# Altium PCB STAND_SSD_2246(CPU).PcbDoc (part 5 of 7)
Units mm, origin at the board's own origin, x right, y up, seen from the top; angles counter-clockwise.
Board outline 70 x 170 mm, 8 copper layers (L1:Top, L2:GND, L3:Sig, L4:VCC, L5:Sig, L6:Sig, L7:GND, L8:Bot), stack 1.112 mm thick; 174 components, 271 nets, 1671 pads, 771 vias.
Unrouted connection lines stored in the file: 138.
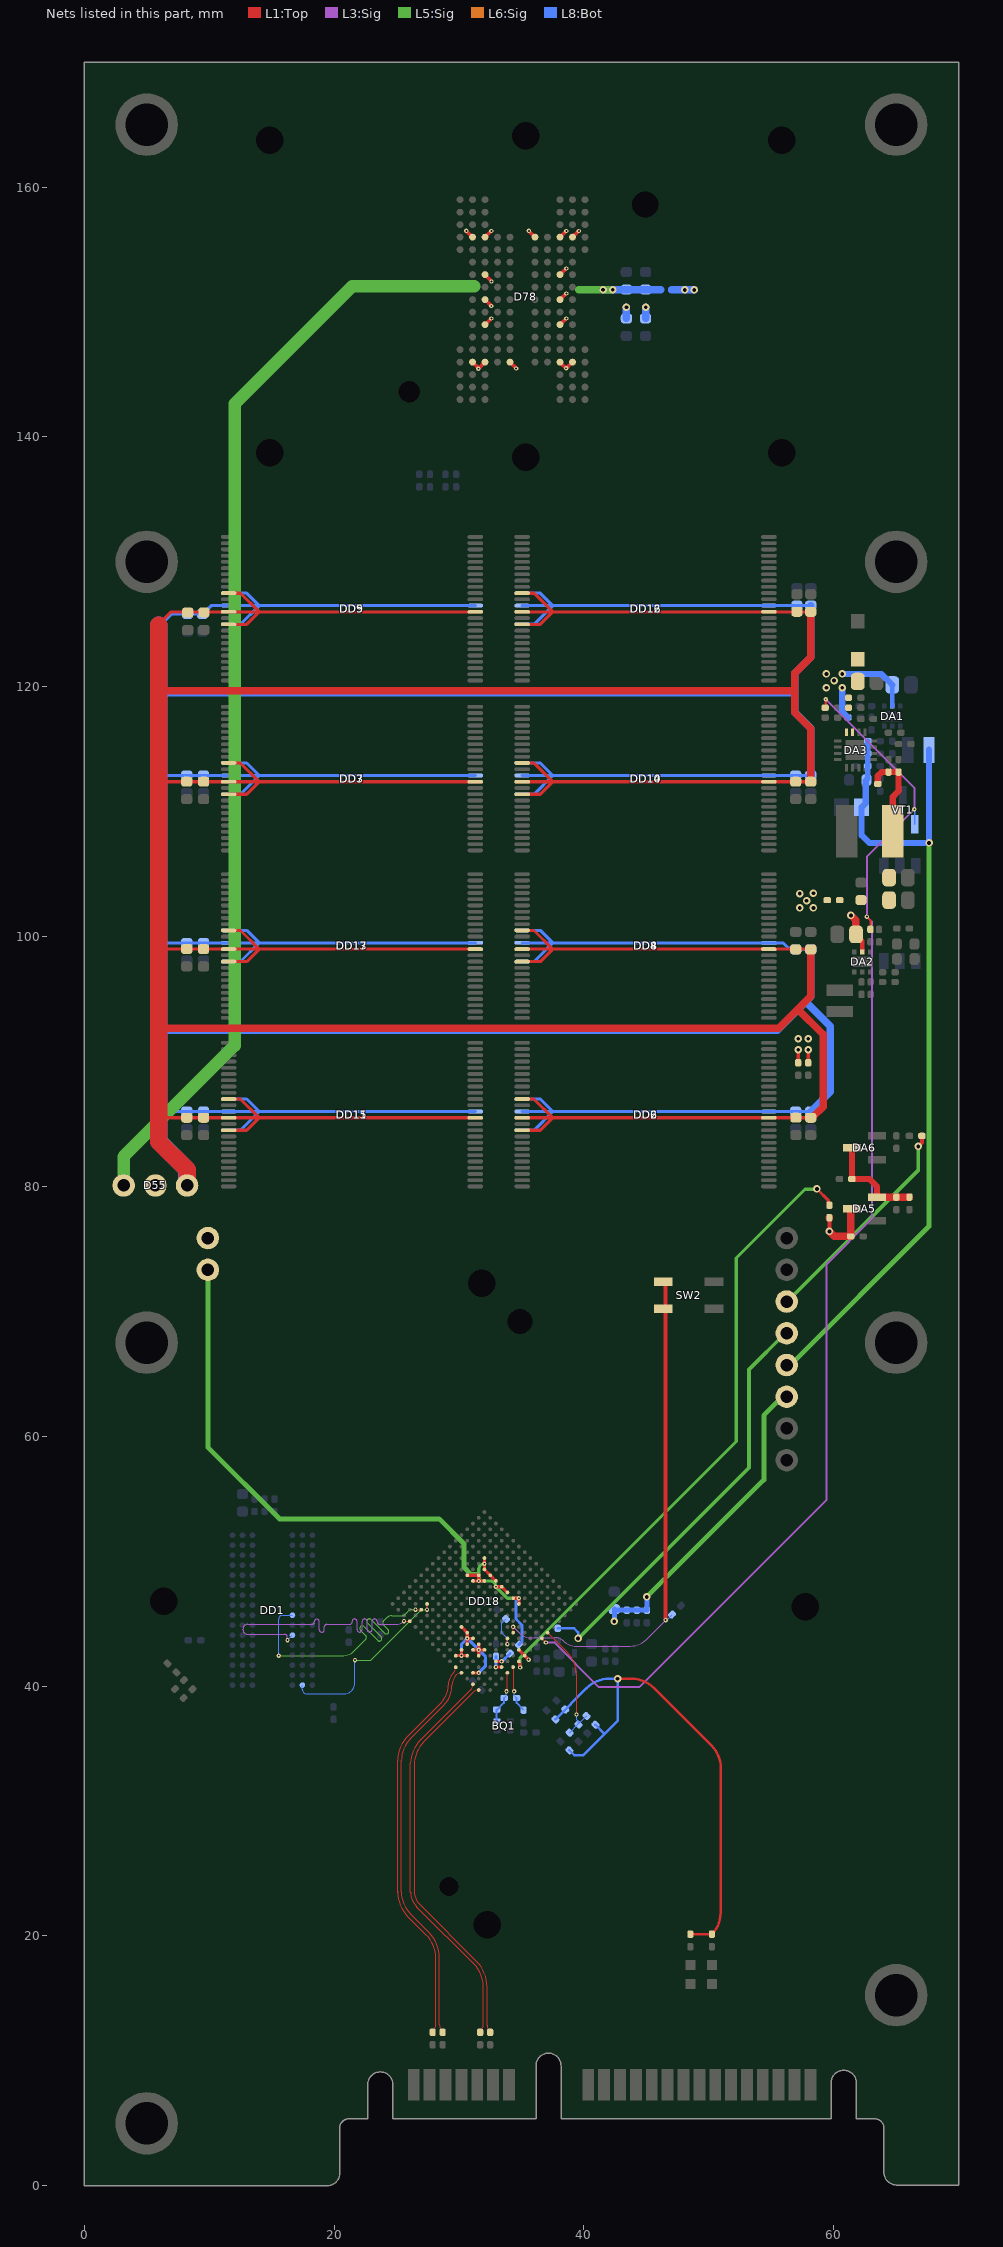
[diagram p11: the nets of this part, all layers, seen from the top]

## Via types
v1: diameter 0.35, hole 0.15, L1:Top to L8:Bot, tented both sides, 722 vias
v2: diameter 0.6, hole 0.3, L1:Top to L8:Bot, tented both sides, 45 vias
v3: diameter 0.6, hole 0.3, L1:Top to L8:Bot, tented bottom, 4 vias

## Nets (pads, with @x,y where several pads share a name; then routed paths per layer and width w, separated by ;. In a path a pad name is that pad's centre, name@x,y a point inside that pad or via, vN(x,y) a via of type N, cw(c..) or ccw(c..) an arc to the next point about the centre after c; other vN are vias at no path point) (continued)
P25: DD18.H4 R20.2 | length 2.9
  L1:Top w0.1: DD18.H4@33.858,43.801 DD18.H4@33.878,43.822 v1(33.878,43.362)
  L8:Bot w0.1: R20.2@33.772,45.384 33.414,45.026 33.414,44.286 33.744,43.956 33.878,43.822 v1(33.878,43.362)
P26: DD18.L1 R30.2 R35.1 VT1.1 | length 103.9
  L1:Top w0.1: DD18.L1@36.636,43.822 v1(36.961,43.497)
  L1:Top w0.15: v1(62.659,101.6) 62.934,101.325 R30.2@62.934,100.575
  L1:Top w0.2: R35.1@59.359,118.325 v1(59.359,119)
  L3:Sig w0.15: v1(36.961,43.497) 37.614,43.497 41.115,39.995 41.188,39.922 44.427,39.922 59.43,54.924 59.43,73.787 63.059,77.416 63.059,101.2 v1(62.659,101.6) 62.659,106.4 v1(66.459,110.2) 66.459,111.9 v1(59.359,119)
  L8:Bot w0.1: v1(66.459,110.2) v1@66.484,110.175
  L8:Bot w0.15: VT1.1@66.484,109 v1@66.484,110.175
PDIAG: 
PWM-33V: C58.1 C59.2 C60.2 C61.2 L3.2 R41.2 R43.2 R45.1 | length 7.4
  L1:Top w0.5: R41.2@63.534,112.225 63.534,112.864 63.845,113.175 C58.1@64.384,113.175 R43.2@65.184,113.175 65.184,111.635 64.724,111.175 L3.2@64.724,108.425
RAM_RESET#: DD1.T2 DD18.D14 | length 15
  L1:Top w0.1: v1(27.444,46.12) DD18.D14@27.444,46.579
  L5:Sig w0.1: v1(21.677,42.081) 22.945,42.081 26.984,46.12 v1(27.444,46.12)
  L8:Bot w0.1: DD1.T2@17.47,40.079 17.47,39.735 ccw(c17.827,39.735) 17.827,39.379 20.802,39.379 ccw(c20.802,40.254) 21.677,40.254 v1(21.677,42.081)
RAS#: DD1.J3 DD18.C14 | length 23.9
  L1:Top w0.1: v1(26.524,46.12) DD18.C14@26.984,46.12
  L5:Sig w0.1: v1(15.577,42.443) 20.787,42.443 ccw(c20.787,43.489) 21.527,42.749 22.505,43.728 22.541,43.763 ccw(c22.399,43.905) 22.541,44.046 22.116,44.47 cw(c22.258,44.612) 22.116,44.753 cw(c22.258,44.612) 22.399,44.753 23.485,43.668 ccw(c23.626,43.809) 23.767,43.668 ccw(c23.626,43.809) 23.767,43.951 22.682,45.036 cw(c22.824,45.177) 22.682,45.319 cw(c22.824,45.177) 22.965,45.319 24.05,44.233 ccw(c24.192,44.375) 24.333,44.233 ccw(c24.192,44.375) 24.333,44.516 23.955,44.895 cw(c24.096,45.036) 23.955,45.177 24.275,45.498 cw(c24.615,45.158) 24.311,45.53 cw(c24.615,45.158) 24.615,45.638 25.423,45.638 ccw(c25.423,46.026) 25.697,45.752 25.93,45.985 cw(c26.255,45.66) 26.255,46.12 v1(26.524,46.12)
  L8:Bot w0.1: v1(15.577,42.443) 15.577,44.195 ; 15.577,44.196 15.577,45.372 cw(c15.884,45.372) 15.884,45.679 DD1.J3@16.67,45.679
RESET: 
RSTIN: C5.2 DD18.M1 R13.2 R15.1 | length 10.3
  L1:Top w0.1: DD18.M1@37.096,44.281 38.668,42.709 cw(c36.872,40.913) 39.412,40.913 v1(39.412,37.73)
  L8:Bot w0.1: C5.2@38.866,36.27 R13.2@39.566,36.97 ; v1(39.412,37.73) 39.412,37.314 R13.2@39.661,37.065 ; R13.2@39.566,36.933 R13.2@39.566,36.97 ; R13.2@39.566,37.115 R13.2@39.566,36.97 ; R15.1@40.22,37.616 40.213,37.616 R13.2@39.661,37.065 ; R13.2@39.566,36.97 R13.2@39.661,37.065
RX1_N: 
RX1_P: 
RX_N: C8.2 DD18.A5 | length 31.7
  L1:Top w0.1: 25.388,23.546 ccw(c27.928,23.546) 26.132,21.75 27.609,20.273 cw(c25.604,18.268) 28.44,18.268 28.44,12.886 ccw(c29.137,12.886) 28.644,12.393 cw(c28.54,12.288) C8.2@28.687,12.288 ; 25.391,23.546 25.391,34.024 cw(c27.931,34.024) 26.135,35.82 28.784,38.469 ccw(c27.208,40.045) 29.437,40.045 29.437,40.05 cw(c30.627,40.05) 29.785,40.891 cw(c30.201,40.476) DD18.A5@30.201,41.064
RX_P: C6.2 DD18.A6 | length 32.1
  L1:Top w0.1: 25.088,23.545 ccw(c27.926,23.545) 25.919,21.539 27.396,20.062 cw(c25.6,18.266) 28.14,18.266 28.14,12.886 cw(c27.442,12.886) 27.935,12.393 ccw(c28.04,12.288) C6.2@27.892,12.288 ; 25.091,23.442 25.091,34.025 cw(c27.928,34.025) 25.922,36.031 28.568,38.677 ccw(c27.195,40.05) 29.137,40.05 29.137,40.052 cw(c30.632,40.052) 29.575,41.109 29.62,41.154 ccw(c29.325,41.449) 29.742,41.449 DD18.A6@29.742,41.524
T0: 
T1: 
T2: 
T3: 
T4: 
T5: 
T6: 
T7: 
T8: 
TX: DD18.J4 R21.1 SW2.1 SW2.2 | length 41.8
  L1:Top w0.1: DD18.J4@34.338,44.281 v1(34.338,44.741)
  L1:Top w0.3: v1(46.541,45.282) SW2.1@46.541,72.426
  L3:Sig w0.1: v1(34.338,44.741) 34.817,44.261 ; 34.818,44.261 ccw(c35.74,45.184) 35.74,43.879 37.646,43.879 cw(c37.646,42.756) 38.44,43.55 ccw(c39.277,44.387) 39.277,43.204 43.198,43.204 43.723,43.204 ccw(c43.723,44.993) 44.987,43.727 ; 44.988,43.728 v1(46.541,45.282)
  L8:Bot w0.1: v1(46.541,45.282) ccw(c46.541,45.459) 46.667,45.333 R21.1@47.062,45.729
TX1_N: 
TX1_P: 
TX_N: C9.2 DD18.A2 | length 31.8
  L1:Top w0.1: DD18.A2@31.58,39.685 ccw(c31.58,39.088) 31.158,39.51 27.19,35.542 ccw(c29.052,33.679) 26.418,33.68 26.418,23.625 ccw(c28.037,23.625) 26.892,22.48 31.419,17.954 cw(c29.414,15.949) 32.249,15.949 32.249,13.073 32.249,12.835 ccw(c32.823,12.835) 32.417,12.429 32.458,12.388 cw(c32.358,12.288) C9.2@32.499,12.288
TX_P: C7.2 DD18.A3 | length 32.1
  L1:Top w0.1: DD18.A3@31.12,40.145 cw(c30.523,40.145) 30.945,39.722 26.977,35.753 ccw(c28.983,33.747) 26.93,35.706 ccw(c29.052,33.679) 26.121,33.806 26.118,33.804 26.118,23.501 26.122,23.496 ccw(c28.037,23.625) 26.634,22.315 ccw(c27.954,23.544) 26.679,22.269 31.205,17.743 cw(c29.409,15.947) 31.949,15.947 31.949,13.197 31.949,12.892 cw(c31.237,12.892) 31.741,12.388 ccw(c31.841,12.288) C7.2@31.699,12.288
VAA: 
VCC5I: C45.2 C46.1 C47.1 C50.2 C66.1 DA1.5 DA2.5 DA3.11 DA3.12 DA5.1 R9.2 R29.2 R34.1 VD4.1 | length 17.1
  L1:Top w0.3: v2(59.659,76.4) R9.2@59.659,77.5
  L1:Top w0.35: C46.1@61.784,100.175 62.284,99.675 DA2.5@62.284,98.775
  L1:Top w0.6: v2(59.659,76.4) 60.059,76 C66.1@61.359,76 61.359,78.1 DA5.1@61.459,78.2 ; v2(61.384,101.7) 61.784,101.3 C46.1@61.784,100.175
  L8:Bot w0.35: DA1.5@64.684,118.45 C47.1@64.684,120.15
  L8:Bot w0.5: v2(60.675,119.925) 60.675,118.01 R29.2@61.134,117.55 ; v2(60.675,121.025) 63.809,121.025 C47.1@64.684,120.15
  other v2: 59.417,119.925 60.025,120.5 59.417,121.025
VCC5VI: DD18.G1 R9.1 | length 50.9
  L1:Top w0.25: DD18.G1@34.797,41.983 34.876,41.587 v1(34.895,41.49) ; v2(58.659,79.8) 59.563,78.896 59.563,78.596 R9.1@59.659,78.5
  L5:Sig w0.25: v1(34.895,41.49) 34.895,42.277 38.453,45.835 52.195,59.578 52.195,74.277 57.7,79.781 58.64,79.781 v2(58.659,79.8)
VCCF: C11.2 C12.2 C13.2 C14.2 C15.2 C16.2 C17.2 C18.2 C19.2 C20.2 C21.2 C22.2 C23.2 C24.2 C25.2 C26.2 C27.2 C28.2 C29.2 C30.2 C31.2 C32.2 C33.2 C34.2 C35.2 C36.2 C37.2 C38.2 C39.2 C40.2 C41.2 C42.2 C62.2 C68.2 D50.1 D50.2 D55.1 D55.2 D55.3 D78.D7 D78.J3 D78.J9 D78.P5 DD2.12 DD2.34 DD2.37 DD2.39 DD3.12 DD3.34 DD3.37 DD3.39 DD4.12 DD4.34 DD4.37 DD4.39 DD5.12 DD5.34 DD5.37 DD5.39 DD6.12 DD6.34 DD6.37 DD6.39 DD7.12 DD7.34 DD7.37 DD7.39 DD8.12 DD8.34 DD8.37 DD8.39 DD9.12 DD9.34 DD9.37 DD9.39 DD10.12 DD10.34 DD10.37 DD10.39 DD11.12 DD11.34 DD11.37 DD11.39 DD12.12 DD12.34 DD12.37 DD12.39 DD13.12 DD13.34 DD13.37 DD13.39 DD14.12 DD14.34 DD14.37 DD14.39 DD15.12 DD15.34 DD15.37 DD15.39 DD16.12 DD16.34 DD16.37 DD16.39 DD17.12 DD17.34 DD17.37 DD17.39 DD18.K12 DD18.K13 DD18.L11 DD18.L12 DD18.M6 DD18.M7 DD18.M8 DD18.M9 DD18.M10 DD18.M11 DD18.M12 DD18.N13 R11.2 R17.2 R25.2 R26.2 R45.2 | length 998.6
  L1:Top w0.25: 5.824,112.4 5.963,112.4 C13.2@8.209,112.4 C11.2@9.559,112.4 DD3.37@11.559,112.4 14.003,112.4 ; 6.002,99 C34.2@8.209,99 C32.2@9.559,99 DD13.37@11.559,99 14.003,99 ; 6.007,125.045 6.962,126 8.289,126 9.589,126 DD5.37@11.559,126 14.003,126 ; 6.145,85.5 C30.2@8.209,85.5 C28.2@9.559,85.5 DD11.37@11.559,85.5 14.003,85.5 ; DD11.39@11.559,84.5 13.003,84.5 14.003,85.5 ; DD11.34@11.559,87 11.569,86.99 12.513,86.99 14.003,85.5 ; DD13.39@11.559,98 13.003,98 14.003,99 ; DD13.34@11.559,100.5 11.569,100.49 12.513,100.49 14.003,99 ; DD3.39@11.559,111.4 13.003,111.4 14.003,112.4 ; DD3.34@11.559,113.9 11.569,113.89 12.513,113.89 14.003,112.4 ; DD5.39@11.559,125 13.003,125 14.003,126 ; DD5.34@11.559,127.5 11.569,127.49 12.513,127.49 14.003,126 ; DD18.K13@30.661,48.877 31.12,48.877 DD18.L12@31.58,48.877 v1(31.58,48.418) ; DD18.K12@31.12,48.418 v1(31.58,48.418) ; DD11.12@31.309,85.5 14.003,85.5 ; DD13.12@31.309,99 14.003,99 ; DD3.12@31.309,112.4 14.003,112.4 ; DD5.12@31.309,126 14.003,126 ; DD18.L11@32.04,48.418 v1(31.58,48.418) ; DD18.N13@32.04,50.256 v1(32.04,49.797) DD18.M12@32.04,49.337 DD18.M11@32.499,48.877 DD18.M10@32.959,48.418 ; v1(32.959,47.958) DD18.M9@33.419,47.958 DD18.M8@33.878,47.499 ; DD18.M7@34.338,47.039 v1(34.797,47.039) DD18.M6@34.797,46.579 ; DD2.39@35.059,84.5 36.503,84.5 37.503,85.5 ; DD2.37@35.059,85.5 37.503,85.5 ; DD2.34@35.059,87 35.069,86.99 36.013,86.99 37.503,85.5 ; DD4.39@35.059,98 36.503,98 37.503,99 ; DD4.37@35.059,99 37.503,99 ; DD4.34@35.059,100.5 35.069,100.49 36.013,100.49 37.503,99 ; DD10.39@35.064,111.4 36.508,111.4 37.508,112.4 ; DD10.37@35.064,112.4 37.508,112.4 ; DD10.34@35.064,113.9 35.074,113.89 36.018,113.89 37.508,112.4 ; DD12.39@35.064,125 36.508,125 37.508,126 ; DD12.37@35.064,126 37.508,126 ; DD12.34@35.064,127.5 35.074,127.49 36.018,127.49 37.508,126 ; R26.2@57.159,89.9 v2(57.159,90.95) ; R25.2@57.959,89.9 v2(57.959,90.95) ; C14.2@58.159,85.5 56.979,85.5 DD2.12@54.809,85.5 37.503,85.5 ; C16.2@58.159,99 56.963,99 DD4.12@54.809,99 37.503,99 ; C29.2@58.164,112.4 C27.2@56.959,112.4 DD10.12@54.814,112.4 37.508,112.4 ; C33.2@58.164,126 C31.2@57.059,126 DD12.12@54.814,126 37.508,126
  L1:Top w0.3: D78.J3@32.098,150.982 v1@32.566,150.515 ; D78.P5@34.098,145.982 v1@34.566,145.515 ; v1@35.611,156.471 D78.D7@36.078,156.004 ; D78.J9@38.099,151.003 v1@38.566,151.47
  L1:Top w0.6: 5.769,119.699 5.963,119.699 56.879,119.699 ; 6.011,92.675 55.606,92.675 57.125,94.195 ; C16.2@58.163,98.981 58.163,95.232 57.125,94.195 ; C29.2@58.164,112.4 58.164,116.659 56.879,117.943 56.879,119.699 ; C33.2@58.164,126 58.164,122.355 56.879,121.07 56.879,119.699 ; C14.2@58.271,85.493 58.271,85.562 58.309,85.6 58.379,85.6 59.154,86.375 59.154,92.166 57.125,94.195
  L1:Top w1.4: 5.963,124.947 5.963,119.699 5.963,112.4 5.963,99 5.963,92.675 5.963,85.5 5.963,83.596 8.239,81.32 D55.3@8.239,80.118 ; D55.3@8.159,80.154 D55.3@8.236,80.077
  L5:Sig w0.25: v1(32.04,49.797) ccw(c32.04,49.337) 31.58,49.337 v1(31.58,48.418) 32.499,48.418 cw(c32.499,47.958) v1(32.959,47.958) 33.878,47.039 v1(34.797,47.039)
  L5:Sig w0.4: D50.1@9.898,73.327 9.898,59.122 15.633,53.388 28.415,53.388 30.398,51.404 30.398,49.513 30.992,48.919 31.5,48.919
  L5:Sig w0.6: 39.574,151.778 v2@42.302,151.778
  L5:Sig w1: D55.1@3.156,80.077 3.156,82.387 12.044,91.275 12.044,142.638 21.456,152.051 31.242,152.051
  L6:Sig w0.25: v1@31.561,48.437 v1(31.58,48.418)
  L8:Bot w0.25: 5.993,99.5 C42.2@8.209,99.5 C40.2@9.559,99.5 DD17.37@11.559,99.5 14.003,99.5 ; 6.033,86 C38.2@8.209,86 DD15.37@11.559,86 14.003,86 ; 6.092,112.9 C21.2@8.209,112.9 C19.2@9.559,112.9 DD7.37@11.559,112.9 14.003,112.9 ; 6.322,125.151 7.003,125.833 C23.2@8.27,125.833 C25.2@9.47,125.833 ; C25.2@9.659,126 10.159,126.5 DD9.37@11.559,126.5 14.003,126.5 ; DD15.34@11.559,84.5 11.569,84.51 12.513,84.51 14.003,86 ; DD15.39@11.559,87 13.003,87 14.003,86 ; DD17.34@11.559,98 11.569,98.01 12.513,98.01 14.003,99.5 ; DD17.39@11.559,100.5 13.003,100.5 14.003,99.5 ; DD7.34@11.559,111.4 11.569,111.41 12.513,111.41 14.003,112.9 ; DD7.39@11.559,113.9 13.003,113.9 14.003,112.9 ; DD9.34@11.559,125 11.569,125.01 12.513,125.01 14.003,126.5 ; DD9.39@11.559,127.5 13.003,127.5 14.003,126.5 ; DD15.12@31.309,86 14.003,86 ; DD17.12@31.309,99.5 14.003,99.5 ; DD7.12@31.309,112.9 14.003,112.9 ; DD9.12@31.309,126.5 14.003,126.5 ; R11.2@34.793,43.322 35.04,43.569 35.04,44.893 34.561,45.372 34.561,46.803 v1(34.797,47.039) ; DD6.34@35.064,84.5 35.074,84.51 36.018,84.51 37.508,86 ; DD6.37@35.064,86 37.508,86 ; DD6.39@35.064,87 36.508,87 37.508,86 ; DD8.34@35.064,98 35.074,98.01 36.018,98.01 37.508,99.5 ; DD8.37@35.064,99.5 37.508,99.5 ; DD8.39@35.064,100.5 36.508,100.5 37.508,99.5 ; DD14.34@35.064,111.4 35.074,111.41 36.018,111.41 37.508,112.9 ; DD14.37@35.064,112.9 37.508,112.9 ; DD14.39@35.064,113.9 36.508,113.9 37.508,112.9 ; DD16.34@35.064,125 35.074,125.01 36.018,125.01 37.508,126.5 ; DD16.37@35.064,126.5 37.508,126.5 ; DD16.39@35.064,127.5 36.508,127.5 37.508,126.5 ; C26.2@58.163,98.978 C24.2@56.958,98.978 56.837,99.099 56.34,99.099 55.939,99.5 DD8.12@54.814,99.5 37.508,99.5 ; C22.2@58.164,86 C20.2@56.959,86 DD6.12@54.814,86 37.508,86 ; C37.2@58.164,112.9 C35.2@56.959,112.9 DD14.12@54.814,112.9 37.508,112.9 ; C41.2@58.164,126.5 C39.2@57.059,126.5 DD16.12@54.814,126.5 37.508,126.5
  L8:Bot w0.6: 5.99,119.523 56.884,119.523 ; 6.168,92.508 55.477,92.508 57.759,94.79 ; v2(41.537,151.781) v2(42.302,151.781) R17.2@46.155,151.781 ; C26.2@58.163,98.978 58.163,95.194 57.759,94.79 ; C22.2@58.164,86 58.214,86 58.314,86.1 58.314,86.15 59.732,87.568 59.732,92.817 57.759,94.79 ; C37.2@58.164,112.9 58.164,116.677 56.884,117.957 56.884,119.523 ; C41.2@58.164,126.5 58.164,122.348 56.884,121.068 56.884,119.523
  L8:Bot w1.4: 5.976,124.94 5.976,83.625 8.219,81.383 D55.3@8.219,79.93
  other v1: 34.581,145.485 32.581,150.485 38.596,151.485 35.596,156.501
  other v2: 57.159,91.825 57.959,91.825 57.275,102.3 58.375,102.3 57.275,103.45 58.375,103.475
  other v3: 57.825,102.875
VCCFQ: C62_1.2 C68_1.2 D78.D2 D78.D3 D78.D9 D78.D10 D78.G3 D78.G9 D78.L3 D78.L9 D78.P2 D78.P3 D78.P9 D78.P10 R17.1 | length 11.6
  L1:Top w0.3: v1@30.611,156.471 D78.D2@31.078,156.004 ; D78.P2@31.098,145.982 v1@31.566,145.515 ; v1(31.554,145.458) D78.P3@32.088,145.993 ; D78.L3@32.099,149.003 v1@32.566,149.47 ; D78.D3@32.099,156.003 v1@32.566,156.47 ; D78.G3@32.124,152.941 v1@32.592,152.473 ; D78.P9@38.098,145.963 v1@38.566,145.496 ; D78.L9@38.099,149.003 v1@38.566,149.47 ; D78.G9@38.099,153.003 v1@38.566,153.47 ; D78.D9@38.099,156.003 v1@38.566,156.47 ; v1@38.61,145.516 D78.P10@39.077,145.983 ; D78.D10@39.099,156.003 v1@39.566,156.47
  L8:Bot w0.3: v2@43.401,150.366 v2@43.425,150.391
  L8:Bot w0.6: C68_1.2@43.401,149.488 v2@43.401,150.366 ; C62_1.2@44.943,149.488 v2@44.943,150.366 ; R17.1@47.031,151.768 R17.1@47.071,151.768 v2(48.07,151.768) v2(48.834,151.768)
  other v1: 38.58,145.501 32.596,149.485 38.596,149.485 32.607,152.443 38.596,153.485 32.596,156.485 38.596,156.485 39.596,156.485 30.596,156.501
  other v2: 43.405,150.391 44.948,150.391
VCCIO: D52.1 D52.2 DD18.H1 DD18.H2 R12.2 R15.2 R16.2 R19.2 R22.1 R23.2 R24.2 R50.2 | length 95.5
  L1:Top w0.2: v2@42.558,40.725 v2(42.699,40.584) ; v2@42.78,40.583 42.74,40.543 v2(42.699,40.584) ; R24.2@48.53,20.14 R23.2@50.249,20.14 ccw(c48.553,21.835) 50.951,21.835 50.951,33.458 ccw(c48.411,33.458) 50.207,35.254 45.621,39.84 ccw(c43.825,38.044) 43.825,40.584 v2(42.699,40.584)
  L1:Top w0.25: DD18.H2@34.797,42.902 DD18.H1@35.257,42.443 v1(35.582,42.118)
  L1:Top w0.3: v3(66.759,83.2) 67.059,83.5 R50.2@67.059,84.05
  L5:Sig w0.3: v2(39.54,43.815) 39.54,43.806 40.011,44.277 53.216,57.482 53.216,65.346 56.116,68.246 D52.1@56.234,68.246 ; D52.2@56.234,70.786 56.279,70.786 66.759,81.267 v3(66.759,83.2)
  L8:Bot w0.2: R12.2@37.722,37.338 40.225,39.84 cw(c42.021,38.044) 42.021,40.584 v2(42.699,40.584) 42.699,37.212 39.961,34.474 39.227,34.474 R16.2@38.837,34.865 ; R22.1@37.911,44.616 39.232,44.616 39.54,44.308 v2(39.54,43.815) ; R15.2@40.927,36.909 41.658,36.178
VCCK: C51.1 C54.1 C56.2 C73.2 C75.1 C76.1 C82.1 D53.1 D53.2 DD18.B4 DD18.B7 DD18.C6 DD18.C7 DD18.D5 DD18.D6 DD18.D7 DD18.E5 DD18.E6 DD18.E7 DD18.E8 DD18.E9 L1.2 L4.1 R37.2 | length 103.7
  L1:Top w0.25: DD18.B7@29.742,42.443 v1(30.201,42.443) ; DD18.C7@30.201,42.902 v1(30.201,42.443) ; DD18.E9@30.201,44.741 DD18.E8@30.661,44.281 v1(30.661,43.822) ; DD18.C6@30.661,42.443 v1(30.201,42.443) ; DD18.D7@30.661,43.362 v1(30.661,43.822) ; DD18.B4@31.12,41.064 v1(31.58,41.064) ; DD18.D6@31.12,42.902 v1(31.58,42.902) ; DD18.E7@31.12,43.822 v1(30.661,43.822) ; DD18.D5@31.58,42.443 v1(31.58,42.902) ; DD18.E6@31.58,43.362 v1(31.58,42.902) ; DD18.E5@32.04,42.902 v1(31.58,42.902)
  L5:Sig w0.4: v2(45.04,47.143) 54.412,56.515 54.412,61.679 D53.1@56.053,63.321 ; D53.1@56.217,63.149 D53.1@56.234,63.166 ; D53.2@56.442,65.616 67.634,76.809 v2(67.634,107.5)
  L8:Bot w0.25: v1(30.201,42.443) 30.201,43.362 v1(30.661,43.822) v1(31.58,42.902) 32.14,42.343 32.14,41.624 v1(31.58,41.064)
  L8:Bot w0.4: v2(42.44,45.179) C73.2@42.44,46.158 42.519,46.079 43.24,46.079 44.24,46.079 C82.1@45.04,46.079 v2(45.04,47.143)
  L8:Bot w0.45: C56.2@62.634,112.55 62.734,112.65 C54.1@62.734,113.65 C51.1@62.734,115.65
  L8:Bot w0.5: C56.2@62.634,112.55 62.559,112.475 62.559,110.675 L4.1@62.234,110.35 62.234,108.125 62.859,107.5 v2(67.634,107.5) L1.2@67.634,114.95
VDTD_VIN: DD18.E2 R10.1 | length 1.3
  L1:Top w0.25: v1(32.959,41.524) DD18.E2@33.419,41.524
  L8:Bot w0.25: v1(32.959,41.524) R10.1@32.959,42.379
VDTF_VIN: DD18.E3 R11.1 | length 1.4
  L1:Top w0.25: DD18.E3@32.959,41.983 v1(33.419,41.983)
  L8:Bot w0.25: v1(33.419,41.983) 33.454,41.983 R11.1@34.086,42.615
Vout: C67.1 C78.1 DA5.3 DA6.1 R49.1 | length 8.2
  L1:Top w0.5: DA6.1@61.459,83.1 C67.1@61.459,80.6 62.859,80.6 63.459,80 DA5.3@63.459,79.15
  L1:Top w0.6: DA5.3@63.459,79.15 C78.1@65.015,79.15 R49.1@66.059,79.15
WE#: DD1.L3 DD18.A14 | length 24
  L1:Top w0.1: v1(25.605,45.201) DD18.A14@26.065,45.201
  L3:Sig w0.1: v1(16.272,43.681) 16.272,43.912 ccw(c16.041,43.912) 16.041,44.143 13.09,44.143 cw(c13.09,44.524) 12.71,44.524 12.71,44.562 cw(c13.09,44.562) 13.09,44.943 18.174,44.943 18.224,44.943 ccw(c18.224,45.143) 18.424,45.143 18.424,45.154 cw(c18.624,45.154) 18.824,45.154 18.824,44.517 ccw(c19.024,44.517) 19.224,44.517 19.224,44.743 cw(c19.424,44.743) 19.424,44.943 20.012,44.943 21.199,44.943 21.249,44.943 ccw(c21.249,45.143) 21.449,45.143 21.449,45.175 cw(c21.649,45.175) 21.849,45.175 21.849,44.526 ccw(c22.049,44.526) 22.249,44.526 22.249,45.175 cw(c22.449,45.175) 22.649,45.175 22.649,44.526 ccw(c22.849,44.526) 23.049,44.526 23.049,45.175 cw(c23.249,45.175) 23.449,45.175 23.449,45.143 ccw(c23.649,45.143) 23.649,44.943 24.02,44.943 24.983,44.943 ccw(c24.983,45.822) 25.604,45.199 ccw(c24.983,45.822) v1(25.605,45.201)
  L8:Bot w0.1: v1(16.272,43.681) DD1.L3@16.67,44.079
XIN: BQ1.1 C3.2 DD18.E1 R14.2 | length 4.3
  L1:Top w0.1: v1@33.777,39.581 v1@33.779,39.583 ; v1@33.867,39.548 DD18.E1@33.867,41.055 ; DD18.E1@33.878,41.064 DD18.E1@33.887,41.055
  L8:Bot w0.1: R14.2@33.611,39.045 R14.2@33.777,39.211 ; R14.2@33.802,39.186 v1@33.802,39.556
  L8:Bot w0.15: BQ1.1@33.052,37.196 33.014,37.234 C3.2@33.014,38.118 33.067,38.118 33.604,38.655 33.604,39.037 R14.2@33.611,39.045
  other v1: 33.807,39.581
XOUT: DD18.F1 R14.1 R18.2 | length 3.8
  L1:Top w0.1: DD18.F1@34.338,41.524 DD18.F1@34.35,41.512 ; v1@34.375,39.527 DD18.F1@34.375,41.512
  L8:Bot w0.1: R14.1@34.42,39.191 v1@34.42,39.536 ; v1(34.42,39.581) v1@34.465,39.536 ; R14.1@34.465,39.191 R14.1@34.611,39.045
  L8:Bot w0.15: R14.1@34.611,39.045 34.611,38.663 R18.2@35.148,38.126
XTLIN: 
XTLOUT: 
~IOCS16: 
pads on no net: D44.0 D78.0 D78.A1 D78.A2 D78.A3 D78.A9 D78.A10 D78.A11 D78.B1 D78.B2 D78.B3 D78.B9 D78.B10 D78.B11 D78.C1 D78.C2 D78.C3 D78.C9 D78.C10 D78.C11 D78.D1 D78.D11 D78.E1 D78.E11 D78.F8 D78.G7 D78.G8 D78.H2 D78.H3 D78.H5 D78.H9 D78.H10 D78.K2 D78.K3 D78.K7 D78.K9 D78.K10 D78.L4 D78.L5 D78.M4 D78.N1 D78.N11 D78.P1 D78.P11 D78.R1 D78.R2 D78.R3 D78.R9 D78.R10 D78.R11 D78.T1 D78.T2 D78.T3 D78.T9 D78.T10 D78.T11 D78.U1 D78.U2 D78.U3 D78.U9 D78.U10 D78.U11 DA3.3 DA3.7 DA3.8 DA3.16 DD1.J1 DD1.J9 DD1.L1 DD1.L9 DD2.1 DD2.2 DD2.3 DD2.4 DD2.5 DD2.11 DD2.14 DD2.15 DD2.20 DD2.21 DD2.22 DD2.23 DD2.24 DD2.26 DD2.27 DD2.28 DD2.33 DD2.35 DD2.38 DD2.40 DD2.45 DD2.46 DD2.47 DD3.1 DD3.2 DD3.3 DD3.4 DD3.5 DD3.11 DD3.14 DD3.15 DD3.20 DD3.21 DD3.22 DD3.23 DD3.24 DD3.26 DD3.27 DD3.28 DD3.33 DD3.35 DD3.38 DD3.40 DD3.45 DD3.46 DD3.47 DD4.1 DD4.2 DD4.3 DD4.4 DD4.5 DD4.11 DD4.14 DD4.15 DD4.20 DD4.21 DD4.22 DD4.23 DD4.24 DD4.26 DD4.27 DD4.28 DD4.33 DD4.35 DD4.38 DD4.40 DD4.45 DD4.46 DD4.47 DD5.1 DD5.2 DD5.3 DD5.4 DD5.5 DD5.11 DD5.14 DD5.15 DD5.20 DD5.21 DD5.22 DD5.23 DD5.24 DD5.26 DD5.27 DD5.28 DD5.33 DD5.35 DD5.38 DD5.40 DD5.45 DD5.46 DD5.47 DD6.1 DD6.2 DD6.3 DD6.4 DD6.5 DD6.11 DD6.14 DD6.15 DD6.20 DD6.21 DD6.22 DD6.23 DD6.24 DD6.26 DD6.27 DD6.28 DD6.33 DD6.35 DD6.38 DD6.40 DD6.45 DD6.46 DD6.47 DD7.1 DD7.2 DD7.3 DD7.4 DD7.5 DD7.11 DD7.14 DD7.15 DD7.20 DD7.21 DD7.22 DD7.23 DD7.24 DD7.26 DD7.27 DD7.28 DD7.33 DD7.35 DD7.38 DD7.40 DD7.45 DD7.46 DD7.47 DD8.1 DD8.2 DD8.3 DD8.4 DD8.5 DD8.11 DD8.14 DD8.15 DD8.20 DD8.21 DD8.22 DD8.23 DD8.24 DD8.26 DD8.27 DD8.28 DD8.33 DD8.35 DD8.38 DD8.40 DD8.45 DD8.46 DD8.47 DD9.1 DD9.2 DD9.3 DD9.4 DD9.5 DD9.11 DD9.14 DD9.15 DD9.20 DD9.21 DD9.22 DD9.23 DD9.24 DD9.26 DD9.27 DD9.28 DD9.33 DD9.35 DD9.38 DD9.40 DD9.45 DD9.46 DD9.47 DD10.1 DD10.2 DD10.3 DD10.4 DD10.5 DD10.11 DD10.14 DD10.15 DD10.20 DD10.21 DD10.22 DD10.23 DD10.24 DD10.26 DD10.27 DD10.28 DD10.33 DD10.35 DD10.38 DD10.40 DD10.45 DD10.46 DD10.47 DD11.1 DD11.2 DD11.3 DD11.4 DD11.5 DD11.11 DD11.14 DD11.15 DD11.20 DD11.21 DD11.22 DD11.23 DD11.24 DD11.26 DD11.27 DD11.28 DD11.35 DD11.38 DD11.40 DD11.45 DD11.46 DD11.47 DD12.1 DD12.2 DD12.3 DD12.4 DD12.5 DD12.11 DD12.14 DD12.15 DD12.20 DD12.21 DD12.22 DD12.23 DD12.24 DD12.26 DD12.27 DD12.28 DD12.33 DD12.35 DD12.38 DD12.40 DD12.45 DD12.46 DD12.47 DD13.1 DD13.2 DD13.3 DD13.4 DD13.5 DD13.11 DD13.14 DD13.15 DD13.20 DD13.21 DD13.22 DD13.23 DD13.24 DD13.26 DD13.27 DD13.28 DD13.33 DD13.35 DD13.38 DD13.45 DD13.47 DD14.1 DD14.2 DD14.3 DD14.4 DD14.5 DD14.11 DD14.14 DD14.15 DD14.20 DD14.21 DD14.22 DD14.23 DD14.24 DD14.26 DD14.27 DD14.28 DD14.33 DD14.35 DD14.38 DD14.40 DD14.45 DD14.46 DD14.47 DD15.1 DD15.2 DD15.3 DD15.4 DD15.5 DD15.11 DD15.14 DD15.15 DD15.20 DD15.21 DD15.22 DD15.23 DD15.24 DD15.26 DD15.27 DD15.28 DD15.33 DD15.35 DD15.38 DD15.40 DD15.45 DD15.46 DD15.47 DD16.1 DD16.2 DD16.3 DD16.4 DD16.5 DD16.11 DD16.14 DD16.15 DD16.20 DD16.21 DD16.22 DD16.23 DD16.24 DD16.26 DD16.27 DD16.28 DD16.33 DD16.35 DD16.38 DD16.40 DD16.45 DD16.46 DD16.47 DD17.1 DD17.2 DD17.3 DD17.4 DD17.5 DD17.11 DD17.14 DD17.15 DD17.20 DD17.21 DD17.22 DD17.23 DD17.24 DD17.26 DD17.27 DD17.28 DD17.33 DD17.35 DD17.38 DD17.40 DD17.45 DD17.46 DD17.47 DD18.B15 DD18.C8 DD18.D2 DD18.D3 DD18.D8 DD18.G4 DD18.J2 DD18.J3 DD18.K1 DD18.K3 DD18.K4 DD18.K16 DD18.K17 DD18.L2 DD18.L3 DD18.L4 DD18.L17 DD18.M2 DD18.M4 DD18.M5 DD18.M16 DD18.N2 DD18.N4 DD18.P1 DD18.P2 DD18.P17 DD18.R2 DD18.R17 DD18.T1 DD18.U1 DD18.U17

## Polygon pours and split planes (outlines as drawn)
VCCK on L4:VCC "NONET_L07_P-001" (solid, remove dead copper, pour order 16): 58.76,18.478 51.651,11.368 46.12,11.368 46.12,8.374 52.397,8.374 59.798,8.374 ccw(c60.743,8.28) 59.794,8.28 59.794,5.422 cw(c59.739,5.422) 59.738,5.367 38.117,5.367 cw(c38.117,5.419) 38.064,5.42 38.064,9.698 ccw(c37.14,9.699) 37.14,10.623 ccw(c37.14,9.655) 36.172,9.655 36.172,5.449 cw(c36.084,5.449) 36.084,5.361 24.649,5.361 cw(c24.649,5.437) 24.572,5.438 24.572,8.208 ccw(c23.66,8.208) 23.659,9.121 ccw(c23.659,8.159) 22.697,8.159 22.697,5.449 cw(c22.623,5.449) 22.622,5.374 21.147,5.374 ccw(c21.147,4.674) 20.447,4.674 20.447,1.474 cw(c18.973,1.474) 18.972,-0.001 0,-0.001 0,36.903 21.044,36.903 27.473,43.332 31.394,43.332 32.338,44.276 32.338,45.244 27.49,50.092 27.49,74.458 58.76,74.458
DRAM_1V5 on L4:VCC "NONET_L07_P-001" (solid, pour order 21): 32.022,44.366 32.022,45.236 27.16,50.099 27.16,74.453 0,74.453 0,37.237 21.007,37.237 27.326,43.555 31.211,43.555
VCCFQ on L4:VCC "NONET_L-01_P-001" (solid, pour order 22): 0.003,134.631 0.002,169.998 58.749,169.998 58.749,134.631
+5V on L4:VCC "NONET_L07_P-001" (solid, remove dead copper, pour order 17): 70,0.064 64.796,0.064 cw(c64.795,0.922) 64.189,0.316 cw(c64.89,1.017) 63.898,1.017 63.898,4.664 ccw(c63.389,4.665) 63.749,5.026 63.703,5.072 ccw(c63.199,4.569) 63.198,5.281 61.737,5.281 cw(c61.737,5.32) 61.697,5.321 61.697,8.272 ccw(c60.805,8.272) 60.804,9.164 60.667,9.164 ccw(c60.667,8.289) 59.865,8.639 46.367,8.639 46.367,11.1 51.753,11.1 59.08,18.428 59.08,74.438 62.768,74.438 62.768,125.704 59.08,125.704 59.08,170 69.995,170 69.995,80.464 69.995,14.511
VCCIO on L4:VCC "NONET_L07_P-001" (solid, pour order 15): 34.945,42.578 37.307,44.939 40.229,44.939 43.285,41.882 43.285,40.372 42.764,39.851 36.874,39.851 34.945,41.78
VCC5I on L4:VCC "NONET_L07_P-001" (solid, pour order 13): 59.076,125.422 62.484,125.422 62.484,74.816 59.076,74.816
VCCF on L4:VCC "NONET_L07_P-001" (solid, pour order 11): 58.781,134.401 0,134.401 0,74.841 58.781,74.841
GND on L5:Sig "L8:Bot-No Net" (solid, remove dead copper, pour order 7): 19.3,0.064 ccw(c19.3,1.163) 20.4,1.164 20.4,4.664 cw(c21.1,4.664) 21.1,5.364 22.7,5.364 22.7,8.164 cw(c23.68,8.164) 23.68,9.143 23.7,9.143 cw(c23.7,8.244) 24.6,8.243 24.6,5.364 36.2,5.364 36.2,9.764 cw(c37.1,9.764) 37.1,10.664 cw(c37.1,9.664) 38.1,9.664 38.1,5.364 59.8,5.364 59.8,8.364 cw(c60.7,8.364) 60.7,9.264 60.8,9.264 cw(c60.8,8.364) 61.7,8.364 61.7,5.389 ccw(c61.725,5.388) 61.725,5.364 63.2,5.364 cw(c63.2,4.664) 63.9,4.664 63.9,1.164 ccw(c65,1.163) 65,0.064 70,0.064 70,14.596 70,80.564 70.001,169.998 40.724,170.002 40.724,144.558 29.714,144.558 29.714,157.525 40.317,157.525 40.317,170 29.209,170 0,170 0,0.064
VCCF on L5:Sig "NONET_L-01_P-001" (solid, pour order 23): 30.108,157.182 30.108,144.883 40.328,144.883 40.328,157.182
GND on L8:Bot "L8:Bot-No Net" (solid, remove dead copper, pour order 4): 19.301,0.065 ccw(c19.301,1.165) 20.401,1.165 20.401,4.665 cw(c21.101,4.665) 21.101,5.365 22.701,5.365 22.701,8.165 cw(c23.68,8.165) 23.68,9.144 23.701,9.144 cw(c23.701,8.245) 24.601,8.244 24.601,5.365 36.201,5.365 36.201,9.765 cw(c37.1,9.765) 37.101,10.665 cw(c37.101,9.665) 38.101,9.665 38.101,5.365 59.801,5.365 59.801,8.365 cw(c60.7,8.365) 60.701,9.265 60.801,9.265 cw(c60.801,8.365) 61.701,8.365 61.701,5.39 ccw(c61.725,5.39) 61.726,5.365 63.201,5.365 cw(c63.201,4.665) 63.901,4.665 63.901,1.165 ccw(c65,1.165) 65.001,0.065 70.001,0.065 70.001,14.597 70.001,80.565 70.001,170 0,170 0,0.065
GND on L2:GND "L8:Bot-No Net" (solid, remove dead copper, pour order 19): 19.3,0.064 ccw(c19.3,1.164) 20.4,1.164 20.4,4.664 cw(c21.1,4.664) 21.1,5.364 22.7,5.364 22.7,8.164 cw(c23.68,8.164) 23.68,9.143 23.7,9.143 cw(c23.7,8.244) 24.6,8.243 24.6,5.364 36.2,5.364 36.2,9.764 cw(c37.1,9.764) 37.1,10.664 cw(c37.1,9.664) 38.1,9.664 38.1,5.364 59.8,5.364 59.8,8.364 cw(c60.7,8.364) 60.7,9.264 60.8,9.264 cw(c60.8,8.364) 61.7,8.364 61.7,5.389 ccw(c61.725,5.389) 61.725,5.364 63.2,5.364 cw(c63.2,4.664) 63.9,4.664 63.9,1.164 ccw(c65,1.164) 65,0.064 70,0.064 70,14.596 70,80.564 70,170 0,170 0,0.064
GND on L1:Top "L8:Bot-No Net" (solid, remove dead copper, pour order 18): 20.085,0.721 ccw(c20.085,1.821) 21.185,1.821 21.185,5.321 cw(c21.885,5.321) 21.885,6.021 23.485,6.021 23.485,8.821 cw(c24.464,8.821) 24.464,9.801 24.485,9.801 cw(c24.485,8.901) 25.385,8.901 25.385,6.021 36.985,6.021 36.985,10.421 cw(c37.885,10.421) 37.885,11.321 cw(c37.885,10.321) 38.885,10.321 38.885,6.021 60.585,6.021 60.585,9.021 cw(c61.485,9.021) 61.485,9.921 61.585,9.921 cw(c61.585,9.021) 62.485,9.021 62.485,6.046 ccw(c62.51,6.046) 62.51,6.021 63.985,6.021 cw(c63.985,5.321) 64.685,5.321 64.685,1.821 ccw(c65.785,1.821) 65.785,0.721 70.785,0.721 70.785,15.253 70.785,170.657 0.784,170.657 0.784,0.721
no net on Top Overlay "NONET_L-01_P-001" (solid): 58.838,166.743 58.838,159.44 53.902,159.44 53.902,143.175 58.838,143.175 58.838,135.741 40.887,135.74 40.887,166.75
no net on Top Overlay "NONET_L-01_P-001" (solid): 11.838,166.743 11.838,135.743 40.891,135.743 40.891,142.214 29.303,142.214 29.303,159.738 40.922,159.738 40.922,166.743
no net on Top Overlay "NONET_L-01_P-001" (solid): 63.86,43.044 35.575,14.76 22.167,28.168 50.451,56.453
no net on Top Overlay "NONET_L-01_P-001" (solid): 1.316,49.019 29.6,77.303 50.456,56.447 40.592,46.583 32.044,55.13 23.483,46.57 32.031,38.022 22.172,28.163
GND on L3:Sig "L8:Bot-No Net" (solid, remove dead copper, pour order 20): 19.3,0.064 ccw(c19.3,1.164) 20.4,1.164 20.4,4.664 cw(c21.1,4.664) 21.1,5.364 22.7,5.364 22.7,8.164 cw(c23.68,8.164) 23.68,9.143 23.7,9.143 cw(c23.7,8.244) 24.6,8.243 24.6,5.364 36.2,5.364 36.2,9.764 cw(c37.1,9.764) 37.1,10.664 cw(c37.1,9.664) 38.1,9.664 38.1,5.364 59.8,5.364 59.8,8.364 cw(c60.7,8.364) 60.7,9.264 60.8,9.264 cw(c60.8,8.364) 61.7,8.364 61.7,5.389 ccw(c61.725,5.389) 61.725,5.364 63.2,5.364 cw(c63.2,4.664) 63.9,4.664 63.9,1.164 ccw(c65,1.164) 65,0.064 70,0.064 70,14.596 70,80.564 70,170 0,170 0,0.064
GND on L6:Sig "L8:Bot-No Net" (solid, remove dead copper, pour order 8): 19.3,0.065 ccw(c19.3,1.165) 20.4,1.165 20.4,4.665 cw(c21.1,4.665) 21.1,5.365 22.7,5.365 22.7,8.165 cw(c23.68,8.165) 23.68,9.144 23.7,9.144 cw(c23.7,8.245) 24.6,8.244 24.6,5.365 36.2,5.365 36.2,9.765 cw(c37.1,9.765) 37.1,10.665 cw(c37.1,9.665) 38.1,9.665 38.1,5.365 59.8,5.365 59.8,8.365 cw(c60.7,8.365) 60.7,9.265 60.8,9.265 cw(c60.8,8.365) 61.7,8.365 61.7,5.39 ccw(c61.725,5.39) 61.725,5.365 63.2,5.365 cw(c63.2,4.665) 63.9,4.665 63.9,1.165 ccw(c65,1.165) 65,0.065 70,0.065 70,14.597 70,80.565 70,170 0,170 0,0.065
GND on L7:GND "L8:Bot-No Net" (solid, remove dead copper, pour order 10): 19.3,0.064 ccw(c19.3,1.164) 20.4,1.164 20.4,4.664 cw(c21.1,4.664) 21.1,5.364 22.7,5.364 22.7,8.164 cw(c23.68,8.164) 23.68,9.144 23.7,9.144 cw(c23.7,8.244) 24.6,8.244 24.6,5.364 36.2,5.364 36.2,9.764 cw(c37.1,9.764) 37.1,10.664 cw(c37.1,9.664) 38.1,9.664 38.1,5.364 59.8,5.364 59.8,8.364 cw(c60.7,8.364) 60.7,9.264 60.8,9.264 cw(c60.8,8.364) 61.7,8.364 61.7,5.389 ccw(c61.725,5.389) 61.725,5.364 63.2,5.364 cw(c63.2,4.664) 63.9,4.664 63.9,1.164 ccw(c65,1.164) 65,0.064 70,0.064 70,14.596 70,80.564 70,170 0,170 0,0.064

## Other copper
L1:Top:
  pour cut-out: 3.156,78.659 cw(c3.156,80.075) 3.156,81.49 8.236,81.49 cw(c8.236,80.075) 8.236,78.659
  pour cut-out: 43.534,158.657 ccw(c44.916,158.609) 46.298,158.657 ccw(c44.916,158.609)
  pour cut-out: 24.824,143.654 ccw(c26.018,143.613) 27.213,143.654 ccw(c26.018,143.613)
  pour cut-out: 33.709,164.141 ccw(c35.327,164.085) 36.946,164.141 ccw(c35.327,164.085)
  pour cut-out: 13.209,163.791 ccw(c14.827,163.735) 16.446,163.791 ccw(c14.827,163.735)
  pour cut-out: 13.209,138.791 ccw(c14.827,138.735) 16.446,138.791 ccw(c14.827,138.735)
  pour cut-out: 33.709,138.441 ccw(c35.327,138.385) 36.946,138.441 ccw(c35.327,138.385)
  pour cut-out: 54.209,138.791 ccw(c55.827,138.735) 57.446,138.791 ccw(c55.827,138.735)
  pour cut-out: 54.209,163.791 ccw(c55.827,163.735) 57.446,163.791 ccw(c55.827,163.735)
  pour cut-out: 56.078,46.415 ccw(c57.697,46.359) 59.315,46.415 ccw(c57.697,46.359)
  pour cut-out: 8.48,75.867 cw(c9.896,75.867) 11.311,75.867 11.311,73.303 cw(c9.896,73.303) 8.48,73.303
  pour cut-out: 54.815,75.867 cw(c56.231,75.867) 57.647,75.867 57.647,58.088 cw(c56.231,58.088) 54.815,58.088
  pour cut-out: 28.017,23.993 ccw(c29.211,23.952) 30.406,23.993 ccw(c29.211,23.952)
  pour cut-out: 4.742,46.839 ccw(c6.361,46.783) 7.979,46.839 ccw(c6.361,46.783)
  pour cut-out: 30.622,20.959 ccw(c32.241,20.903) 33.859,20.959 ccw(c32.241,20.903)
  pour cut-out: 30.198,72.295 ccw(c31.816,72.239) 33.435,72.295 ccw(c31.816,72.239)
  pour cut-out: 33.604,69.251 ccw(c34.868,69.207) 36.132,69.251 ccw(c34.868,69.207)
  pour cut-out: 27.459,113.669 27.361,113.571 ccw(c27.532,113.4) 27.29,113.4 26.959,113.731 27.142,113.941
  pour cut-out: 26.823,84.1 26.487,83.765 26.487,83.645 26.99,83.645 27.006,83.63
  pour cut-out: 18.659,52.031 18.659,51.818 18.659,51.251 19.402,51.251 19.116,52.07
  pour cut-out: 36.107,87.596 36.12,87.583 36.12,87.249 35.916,87.249 35.744,87.421 35.523,87.421 35.523,87.762 35.471,87.815
  pour cut-out: 36.259,97.404 36.259,97.877 36.239,97.897 36.216,97.874 35.604,97.874 35.604,96.839
  pour cut-out: 36.112,101.096 36.12,101.088 36.12,100.749 35.821,100.749 35.782,100.71 35.782,101.352
  pour cut-out: 36.707,111.202 36.704,111.202 36.14,110.638 35.566,110.638 35.566,111.169 35.583,111.186
  pour cut-out: 62.75,103.809 62.772,103.788 62.772,103.325 61.759,103.325 61.642,103.442 61.642,103.975
  pour cut-out: 26.587,97.297 26.963,97.673 26.965,97.673 26.965,97.228 26.971,97.222
  pour cut-out: 32.525,123.466 32.993,123.466 32.993,123.152 32.95,123.11 32.935,123.125 32.523,123.125
  pour cut-out: 32.525,109.866 32.993,109.866 32.993,109.552 32.95,109.51 32.935,109.525 32.523,109.525
  pour cut-out: 32.525,96.466 32.993,96.466 32.993,96.152 32.95,96.11 32.935,96.125 32.523,96.125
  pour cut-out: 29.3,159.738 40.887,159.738 40.887,142.214 29.3,142.214
  pour cut-out: 31.459,12.62 32.735,12.62 32.735,10.959 31.459,10.959
  pour cut-out: 50.285,71.761 50.539,71.761 50.641,71.862 50.641,72.113 50.267,72.113 50.245,72.135
  pour cut-out: 50.285,70.819 50.539,70.819 50.539,70.52 50.54,70.519 50.222,70.519
  pour cut-out: 49.408,70.342 49.408,70.088 49.456,70.041 49.77,70.041 49.77,70.378 49.777,70.385
  pour cut-out: 49.408,72.492 49.408,72.238 49.769,72.238 49.789,72.219 49.807,72.238 49.807,72.58
  pour cut-out: 7.079,39.215 7.498,38.796 7.498,39.052 7.723,39.277
  pour cut-out: 8.046,38.585 9.131,39.67 8.905,39.896 8.31,39.896 7.926,39.512
  pour cut-out: 49.699,17.124 50.799,17.124 50.799,16.724 49.699,16.724
  pour cut-out: 47.98,17.124 49.08,17.124 49.08,16.724 47.98,16.724
  region net +5V: 61.775,124.859 61.775,125.359 63.675,125.359 63.825,125.509 63.825,126.134 65.825,126.134 65.825,124.134 63.825,124.134 63.825,124.685 63.651,124.859
  pour cut-out: 27.652,12.62 28.928,12.62 28.928,10.959 27.652,10.959
  pour cut-out: 12.628,39.378 12.895,39.378 12.902,39.385 12.902,39.818 12.635,39.818
  pour cut-out: 13.318,43.85 13.697,43.85 13.697,43.575 13.318,43.575
  pour cut-out: 17.68,50.568 18.059,50.568 18.059,50.293 17.68,50.293
  pour cut-out: 16.89,50.573 17.269,50.573 17.269,50.298 16.89,50.298
  pour cut-out: 17.688,51.399 18.067,51.399 18.067,51.124 17.688,51.124
  pour cut-out: 16.275,39.647 16.471,39.647 16.471,40.078 16.275,40.078
  pour cut-out: 16.049,50.605 16.428,50.605 16.428,50.33 16.049,50.33
  pour cut-out: 15.794,51.406 15.794,51.21 16.225,51.21 16.225,51.406
  pour cut-out: 31.968,38.694 39.853,46.579 32.062,54.371 24.177,46.486
  region net +5V: 47.454,6.898 47.454,10.926 50.954,10.926 50.954,6.898
  pour cut-out: 60.895,99.5 61.274,99.5 61.274,99.225 60.895,99.225
  pour cut-out: 65.292,77.866 65.671,77.866 65.671,77.591 65.292,77.591
  pour cut-out: 64.405,77.823 64.784,77.823 64.784,77.548 64.405,77.548
  pour cut-out: 64.496,82.714 64.875,82.714 64.875,82.439 64.496,82.439
  region net NetDA3_1: 61.659,113.8 61.659,110.775 61.909,110.525 61.909,106.3 60.159,106.3 60.159,110.525 60.909,111.275 60.909,113.8
  pour cut-out: 52.459,115.069 52.647,114.84 52.959,115.131 52.79,115.4
  pour cut-out: 27.863,96.44 27.863,96.707 27.856,96.714 27.424,96.714 27.424,96.447
  pour cut-out: 51.689,113.934 51.689,114.202 51.681,114.209 51.249,114.209 51.249,113.941
  pour cut-out: 50.202,128.186 50.202,128.454 50.195,128.461 49.762,128.461 49.762,128.194
  pour cut-out: 59.649,118.572 59.649,118.567 60.046,118.567 60.046,118.376 59.639,118.376
  pour cut-out: 59.514,77.781 59.416,78.066 59.75,78.225 59.913,77.923
  pour cut-out: 65.412,105.648 65.315,105.933 65.649,106.092 65.812,105.791
  pour cut-out: 61.8,103.406 61.702,103.692 62.036,103.85 62.199,103.549
  pour cut-out: 62.52,116.849 62.652,117.12 63.001,116.996 62.903,116.668
  pour cut-out: 9.88,84.486 9.875,85.119 7.956,85.125 7.949,84.495
  pour cut-out: 9.852,97.974 9.848,98.607 7.928,98.613 7.922,97.984
  pour cut-out: 9.862,111.364 9.857,111.997 7.938,112.003 7.932,111.374
  pour cut-out: 7.957,125.553 7.962,124.921 9.881,124.914 9.888,125.544
  pour cut-out: 58.484,84.502 58.479,85.135 56.56,85.141 56.554,84.511
  pour cut-out: 56.658,99.981 56.663,99.348 58.582,99.342 58.588,99.971
  pour cut-out: 58.464,111.4 58.459,112.033 56.54,112.039 56.534,111.409
  pour cut-out: 56.659,127 56.664,126.367 58.583,126.361 58.589,126.991
  pour cut-out: 62.475,119.575 62.88,119.575 62.889,121.442 62.475,121.425
  region net VCC5I: 61.384,122.775 61.359,122.75 61.359,121.05 62.475,121.05 62.475,122.775
  region net VCC5I: 61.659,116.05 60.884,116.05 60.884,118.1 60.884,119.675 61.484,119.675 61.484,116.825 61.659,116.65
  region net VCC5I: 62.475,121.425 58.825,121.425 58.825,119.575 58.875,119.575 62.475,119.575
  region net PWM-33V: 65.609,110.55 65.609,106.325 64.984,105.7 64.984,102.225 63.884,102.225 63.584,102.525 61.734,102.525 61.609,102.65 60.184,102.65 60.184,103.175 61.609,103.175 61.759,103.325 63.784,103.325 63.82,103.389 63.82,110.55
  region net VCCF: 59.784,103.175 59.784,102.675 59.025,102.675 58.875,102.525 58.875,101.9 56.875,101.9 56.875,103.9 58.875,103.9 58.875,103.349 59.049,103.175
L3:Sig:
  pour cut-out: 3.156,78.659 cw(c3.156,80.075) 3.156,81.49 8.236,81.49 cw(c8.236,80.075) 8.236,78.659
  pour cut-out: 43.534,158.657 ccw(c44.916,158.609) 46.298,158.657 ccw(c44.916,158.609)
  pour cut-out: 24.824,143.654 ccw(c26.018,143.613) 27.213,143.654 ccw(c26.018,143.613)
  pour cut-out: 33.709,164.141 ccw(c35.327,164.085) 36.946,164.141 ccw(c35.327,164.085)
  pour cut-out: 13.209,163.791 ccw(c14.827,163.735) 16.446,163.791 ccw(c14.827,163.735)
  pour cut-out: 13.209,138.791 ccw(c14.827,138.735) 16.446,138.791 ccw(c14.827,138.735)
  pour cut-out: 33.709,138.441 ccw(c35.327,138.385) 36.946,138.441 ccw(c35.327,138.385)
  pour cut-out: 54.209,138.791 ccw(c55.827,138.735) 57.446,138.791 ccw(c55.827,138.735)
  pour cut-out: 54.209,163.791 ccw(c55.827,163.735) 57.446,163.791 ccw(c55.827,163.735)
  pour cut-out: 8.48,75.867 cw(c9.896,75.867) 11.311,75.867 11.311,73.303 cw(c9.896,73.303) 8.48,73.303
  pour cut-out: 54.815,75.867 cw(c56.231,75.867) 57.647,75.867 57.647,58.088 cw(c56.231,58.088) 54.815,58.088
  pour cut-out: 28.017,23.993 ccw(c29.211,23.952) 30.406,23.993 ccw(c29.211,23.952)
  pour cut-out: 4.742,46.839 ccw(c6.361,46.783) 7.979,46.839 ccw(c6.361,46.783)
  pour cut-out: 30.622,20.959 ccw(c32.241,20.903) 33.859,20.959 ccw(c32.241,20.903)
  pour cut-out: 30.198,72.295 ccw(c31.816,72.239) 33.435,72.295 ccw(c31.816,72.239)
  pour cut-out: 33.604,69.251 ccw(c34.868,69.207) 36.132,69.251 ccw(c34.868,69.207)
  pour cut-out: 56.078,46.415 ccw(c57.697,46.359) 59.315,46.415 ccw(c57.697,46.359)
  pour cut-out: 37.606,149.792 36.606,149.792 36.606,149.46 37.606,149.46
  pour cut-out: 27.45,133.966 27.443,133.959 26.756,133.959 26.756,133.561 26.674,133.479
  pour cut-out: 30.405,49.132 30.407,49.132 30.868,49.593 30.445,50.016 29.641,50.016 29.557,49.932
  pour cut-out: 39.277,42.992 38.108,42.992 38.091,42.975 37.923,43.144 37.923,43.53
  pour cut-out: 30.266,151.169 30.266,151.118 30.687,150.697 30.338,150.348 30.338,150.249 30.068,150.249 30.042,150.276
  pour cut-out: 52.459,115.069 52.816,114.711 52.816,114.989 52.959,115.131 52.752,115.339 52.67,115.339
  pour cut-out: 52.959,101.131 52.781,101.054 53.128,101.4 53.459,101.069 53.107,100.728
  pour cut-out: 41.991,79.624 42.284,79.331 42.284,79.63 42.323,79.668 42.18,79.811 42.18,79.965
  pour cut-out: 41.31,80.054 41.409,80.054 41.533,79.93 41.75,80.148 41.755,80.148 41.755,80.265 41.637,80.383
  pour cut-out: 41.515,80.912 41.554,80.912 41.691,80.775 41.637,80.721 41.637,80.383 41.442,80.577 41.336,80.471 41.315,80.471
  pour cut-out: 47.954,9.34 50.454,9.34 50.454,9.798 47.954,9.798
  pour cut-out: 48.554,10.957 49.854,10.957 49.854,10.498 48.554,10.498
  pour cut-out: 65.759,96.931 65.765,96.925 66.514,96.925 66.514,96.542 66.204,96.233 66.06,96.233
  pour cut-out: 37.569,39.191 37.136,39.624 37.428,39.917 37.619,39.917 37.957,39.579
  pour cut-out: 12.864,39.846 12.615,39.846 12.615,39.36 12.864,39.36
  pour cut-out: 27.455,47.343 27.276,47.522 26.996,47.241 27.175,47.062
  pour cut-out: 29.556,43.371 29.735,43.55 29.455,43.831 29.275,43.652
  pour cut-out: 29.112,41.97 29.291,42.149 29.011,42.429 28.831,42.25
  pour cut-out: 28.822,42.622 29.002,42.443 29.282,42.723 29.103,42.902
  pour cut-out: 29.106,42.884 29.285,43.064 29.005,43.344 28.825,43.165
  pour cut-out: 29.574,45.175 29.753,45.354 29.473,45.634 29.293,45.455
  pour cut-out: 28.644,46.116 28.824,46.295 28.543,46.576 28.364,46.397
  pour cut-out: 28.206,45.65 28.386,45.829 28.105,46.109 27.926,45.93
  pour cut-out: 37.823,43.604 38.353,43.604 38.353,42.895 37.83,43.055 37.83,43.597
  pour cut-out: 33.248,41.503 33.427,41.682 33.147,41.962 32.968,41.783
  pour cut-out: 59.168,119.531 59.168,119.282 59.654,119.282 59.654,119.531
  pour cut-out: 48.453,102.052 48.274,102.231 47.994,101.951 48.173,101.772
  pour cut-out: 48.44,113.946 48.26,114.125 47.98,113.845 48.159,113.665
  pour cut-out: 65.724,96.338 65.903,96.158 66.184,96.439 66.005,96.618